# EAGLE board Projeto Semáforo 2 (EAGLE 9.7.0)

Size 82.4 x 98.15 mm. Coordinates in mm from the lower left corner, seen from the top.
Outline: 0,0 82.4,0 82.4,98.14 0,98.14 0,0
Copper layers (1*16): Top 0.035mm / dielectric 1.5mm / Bottom 0.035mm
Design rules "default": minimum track width 6mil, minimum drill 0.35mm, track to track 6mil, track to pad 6mil, pad to pad 6mil, via to via 6mil, smd to smd 6mil, copper to edge 40mil, drill to drill 6mil, minimum pad ring 10mil, minimum via ring 8mil, stop-mask expansion 4mil, vias tented up to drill 0mil, thermal gap 10mil

## Footprints (pad centres in the part's own frame; a part is rotated, then mirrored left to right if it is on the bottom)
LEDRD254W60D565H860B_Y = drill 0.981 pad 1.581: 1 -1.27,0; 2 1.27,0
LEDRD254W60D565H860B_G = drill 0.981 pad 1.581: 1 -1.27,0; 2 1.27,0
LEDRD254W60D565H860B = drill 0.981 pad 1.581: 1 -1.27,0; 2 1.27,0
RESAD1016W63L850D250B = drill 0.83 pad 1.43: 1 -5.08,0; 2 5.08,0
ARDUINO-UNO-R3-SHIELD = drill 1.016 pad 1.88: 3.3V 24.13,-2.54; 5V 24.13,0; A0 24.13,12.7; A1 24.13,15.24; A2 24.13,17.78; A3 24.13,20.32; A4 24.13,22.86; A5 24.13,25.4; AREF -24.13,-13.97; D2 -24.13,20.32; D3 -24.13,17.78; D4 -24.13,15.24; D5 -24.13,12.7; D6 -24.13,10.16; D7 -24.13,7.62; D8 -24.13,3.81; D9 -24.13,1.27; D10 -24.13,-1.27; D11 -24.13,-3.81; D12 -24.13,-6.35; D13 -24.13,-8.89; GND@0 24.13,2.54; GND@1 24.13,5.08; GND@2 -24.13,-11.43; IOREF 24.13,-7.62; NC 24.13,-10.16; RES 24.13,-5.08; RX -24.13,25.4; SCL -24.13,-19.05; SDA -24.13,-16.51; TX -24.13,22.86; VIN 24.13,7.62

## Placement (x,y rotation side)
DLED_AMARELO  YELLOW  [LEDRD254W60D565H860B_Y]  17.18,90.24 180 top
DLED_VERDE  GREEN  [LEDRD254W60D565H860B_G]  12.1,90.24 180 top
DLED_VERMELHO  RED  [LEDRD254W60D565H860B]  22.26,90.24 180 top
R1  220  [RESAD1016W63L850D250B]  20.99,77.54 90 top
RRESISTOR1  220  [RESAD1016W63L850D250B]  15.91,77.54 90 top
RRESISTOR2  220  [RESAD1016W63L850D250B]  10.83,77.54 90 top
UARDUINO  ARDUINO-UNO-R3-SHIELD  [ARDUINO-UNO-R3-SHIELD]  47.88,29.84 270 top

## Library data of the parts
DLED_AMARELO = Tinkercad; CATEGORY: Opto-Electronic; SUB-CATEGORY: LED; VALUE: LED_YELLOW
DLED_VERDE = Tinkercad; CATEGORY: Opto-Electronic; SUB-CATEGORY: LED; VALUE: LED_GREEN
DLED_VERMELHO = Tinkercad; CATEGORY: Opto-Electronic; SUB-CATEGORY: LED; VALUE: LED_RED
R1 RRESISTOR1 RRESISTOR2 UARDUINO = Tinkercad

## Nets
DLED_AMARELO_C: DLED_AMARELO.2 RRESISTOR1.2
DLED_VERDE_C: DLED_VERDE.2 RRESISTOR2.2
DLED_VERMELHO_C: DLED_VERMELHO.2 R1.2
UARDUINO_D8: DLED_VERMELHO.1 UARDUINO.D8
UARDUINO_D9: DLED_AMARELO.1 UARDUINO.D9
UARDUINO_D10: DLED_VERDE.1 UARDUINO.D10
UARDUINO_GND: R1.1 RRESISTOR1.1 RRESISTOR2.1 UARDUINO.GND@0 UARDUINO.GND@1 UARDUINO.GND@2

## Tracks (layer width: path | path; a pad name or v marks a point on that pad's centre or on a via)
DLED_AMARELO_C  (1 unrouted)
DLED_VERDE_C  (1 unrouted)
DLED_VERMELHO_C  (1 unrouted)
UARDUINO_D8  (1 unrouted)
UARDUINO_D9  (1 unrouted)
UARDUINO_D10  (1 unrouted)
UARDUINO_GND  (5 unrouted)